# Altium PCB STEP_DRIVER_V3.0.PcbDoc (part 3 of 5)
Units mm, origin at the board's own origin, x right, y up, seen from the top; angles counter-clockwise.
Board outline 245.25 x 200.25 mm, 2 copper layers (Top Layer, Bottom Layer), stack 1.371 mm thick; 477 components, 170 nets, 1104 pads, 876 vias.
Unrouted connection lines stored in the file: 4.
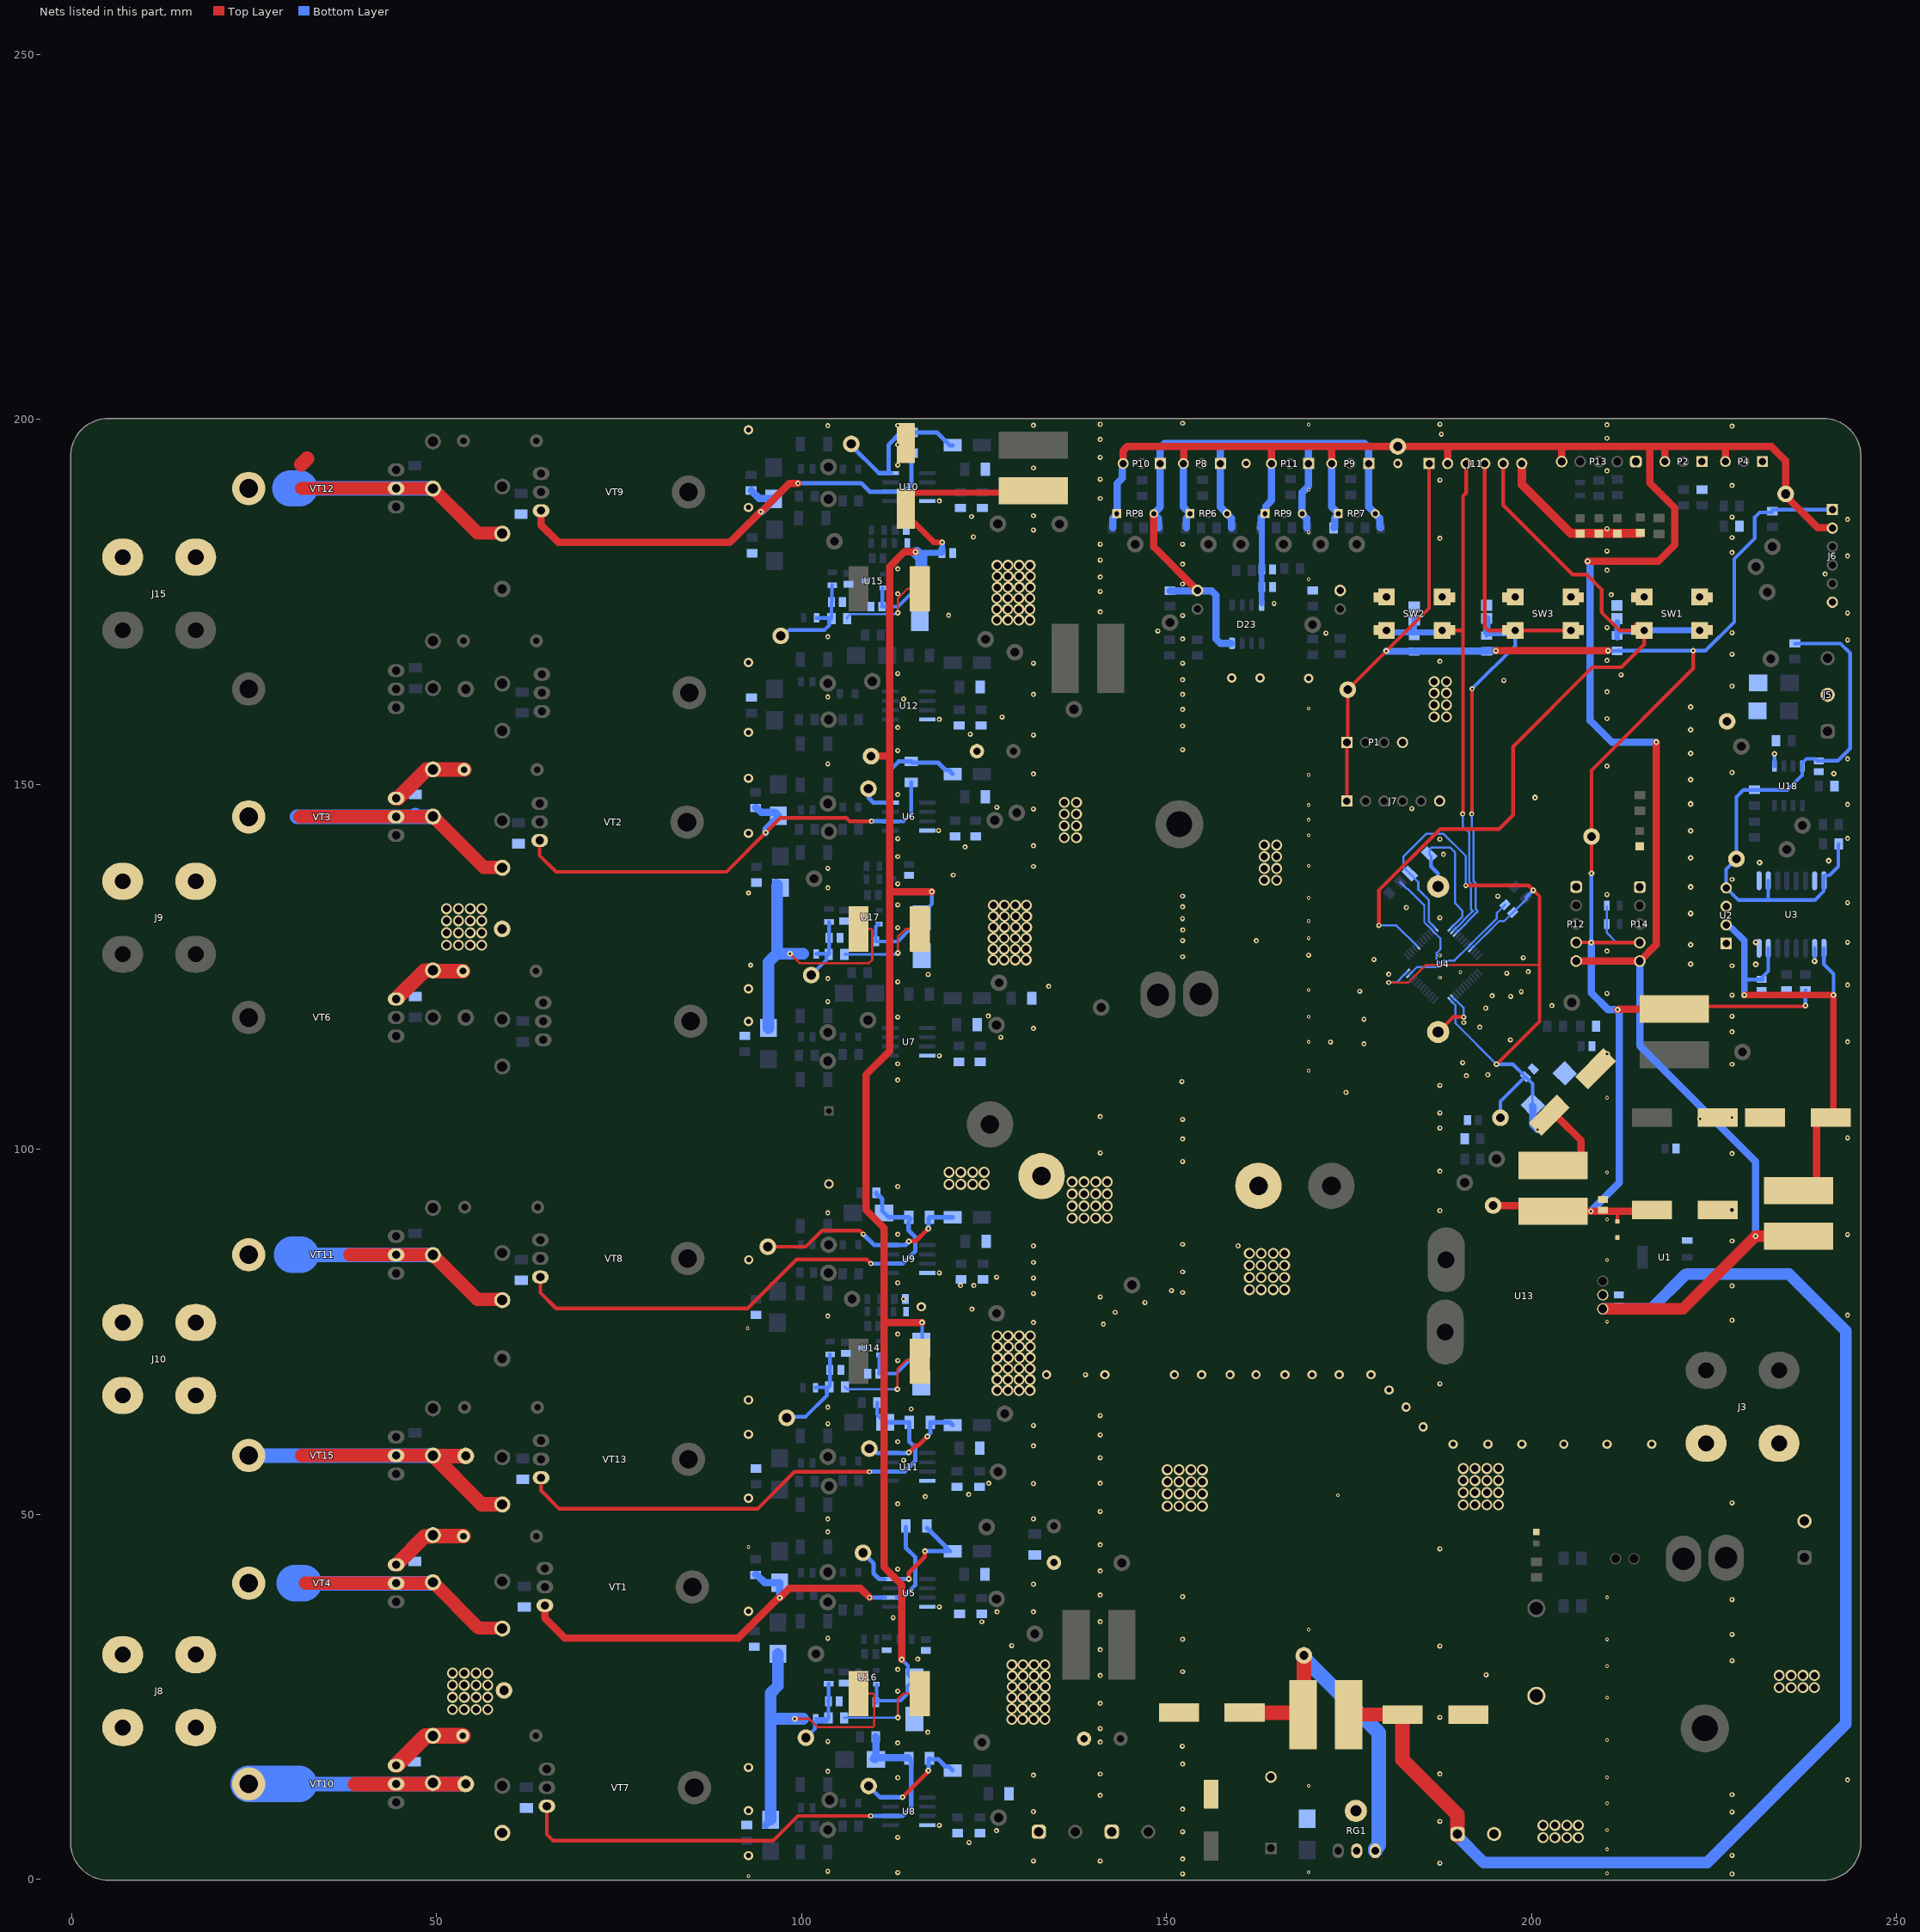
[diagram p2: the nets of this part, all layers, seen from the top]

## Via types
v1: diameter 0.7/0.7 (per signal layer), hole 0.3, Top Layer to Bottom Layer, tented both sides, 388 vias
v2: diameter 1.5/0.7 (per signal layer), hole 1, Top Layer to Bottom Layer, tented both sides, 206 vias
v3: diameter 0.8, hole 0.3, Top Layer to Bottom Layer, tented both sides, 99 vias
v4: diameter 1.5, hole 1, Top Layer to Bottom Layer, 96 vias
v5: diameter 0.5, hole 0.254, Top Layer to Bottom Layer, tented both sides, 42 vias
v6: diameter 1.27, hole 0.711, Top Layer to Bottom Layer, tented both sides, 22 vias
v7: diameter 1.27, hole 0.711, Top Layer to Bottom Layer, 17 vias
v8: diameter 1.27, hole 0.711, Top Layer to Bottom Layer, tented top, 2 vias
v9: diameter 1, hole 0.5, Top Layer to Bottom Layer, 2 vias
v10: diameter 0.7, hole 0.254, Top Layer to Bottom Layer, tented both sides, 2 vias

## Nets (pads, with @x,y where several pads share a name; then routed paths per layer and width w, separated by ;. In a path a pad name is that pad's centre, name@x,y a point inside that pad or via, vN(x,y) a via of type N, cw(c..) or ccw(c..) an arc to the next point about the centre after c; other vN are vias at no path point) (continued)
NetC21_1: (continued)
  Bottom Layer w0.5: TP46.1@101.325,123.875 103.387,125.937 103.387,126.381 R36.2@103.716,126.71 103.635,126.79 R33.1@101.992,126.79 ; R36.2@103.771,126.765 C21.1@103.771,128.979 R71.2@103.771,131.149
NetC22_1: C22.1 R74.2 R110.1 R112.2 TP70.1 | length 15
  Bottom Layer w0.5: TP70.1@97.15,170.35 97.528,170.35 98.336,171.158 103.168,171.158 103.766,171.756 103.766,172.397 R112.2@104.094,172.725 104.015,172.804 R110.1@102.044,172.804 ; R112.2@104.1,172.731 C22.1@104.1,174.985 104.159,175.044 104.159,177.213 R74.2@104.218,177.272
NetC23_1: C23.1 R73.2 R108.1 R111.2 TP69.1 | length 14.3
  Bottom Layer w0.5: TP69.1@98.151,63.376 100.577,63.376 103.472,66.27 103.472,67.122 R111.2@103.8,67.45 ; R108.1@101.919,67.35 101.969,67.4 R111.2@103.75,67.4 ; R111.2@103.8,67.626 103.897,67.723 103.897,69.557 R73.2@103.897,71.924 ; C23.1@103.8,69.557 103.843,69.6 103.843,69.75 C23.1@103.868,69.775
NetC24_1: C24.1 C56.1 C60.2 J8.2 R129.1 TP39.1 U8.6 VD5.1 VD7.2 VT7.S VT10.D ZD7.1 | length 122.5
  Top Layer w0.5: VT7.S@65.117,10.006 65.117,6.129 65.971,5.275 96.093,5.275 99.492,8.674 v1(109.468,8.674)
  Top Layer w2: 38.807,13.054 VT10.D@44.451,13.054 VD7.2@49.243,13.054 ; VD7.2@49.493,13.054 TP39.1@54,13.054
  Bottom Layer w0.6: v1(109.468,8.674) U8.6@112.204,8.674 113.856,8.674 115.023,9.841 115.023,16.227 C24.1@114.675,16.575
  Bottom Layer w1: ZD7.1@109.85,16.494 ZD7.1@109.912,16.432 ; ZD7.1@109.912,16.637 ZD7.1@110.175,16.637 ; R129.1@110.15,19.525 110.175,19.5 ZD7.1@110.175,16.637 ; ZD7.1@110.199,16.432 110.175,16.457 ZD7.1@110.175,16.637 ; C24.1@114.675,16.575 114.612,16.637 ZD7.1@110.175,16.637
  Bottom Layer w2: VT10.D@24.258,13.054 VT10.D@44.451,13.054 TP39.1@54,13.054
  Bottom Layer w5: VT10.D@24.258,13.054 31.144,13.054
NetC24_2: C24.2 D10.1 TP33.1 U8.8 | length 15.9
  Top Layer w0.6: v3(113.856,11.235) 117.322,14.701 117.322,14.859 v3(117.36,14.897)
  Bottom Layer w0.6: TP33.1@109.303,12.665 110.733,11.235 112.183,11.235 U8.8@112.204,11.214 112.225,11.235 v3(113.856,11.235) ; v3(117.36,14.897) 117.398,14.935 117.398,16.448 C24.2@117.525,16.575 117.658,16.442 118.724,16.442 119.718,15.447 120.168,15.447 D10.1@120.718,14.897
NetC29_1: C29.1 C73.1 C77.2 J10.1 R135.1 U9.6 VD9.1 VD11.2 VT8.S VT11.D ZD10.1 | length 112.9
  Top Layer w0.5: VT8.S@64.217,82.506 64.217,80.347 66.364,78.2 92.6,78.2 99.325,84.925 108.918,84.925 v1(109.493,84.35)
  Top Layer w1.8: 38.107,85.554 VT11.D@44.451,85.554 VD11.2@49.658,85.554 ; VD11.2@49.5,85.525 55.598,79.427 58.923,79.427 VD9.1@59,79.35
  Bottom Layer w0.5: v1(109.493,84.35) 109.498,84.345 112.2,84.345 U9.6@112.204,84.341
  Bottom Layer w0.6: R135.1@110.226,94.05 110.226,93.899 110.529,93.596 110.68,93.596 111.046,93.229 111.046,91.579 ZD10.1@111.325,91.3 111.934,90.691 C29.1@114.672,90.691 ; U9.6@112.204,84.341 113.859,84.341 115.597,86.079 115.597,87.367 ; C29.1@114.95,90.567 114.95,90.369 114.672,90.091 114.672,88.891 115.597,87.966 115.597,87.367
  Bottom Layer w2: 31.376,85.554 VT11.D@44.451,85.554 VD11.2@49.5,85.554
  Bottom Layer w5: 30.23,85.554 31.376,85.554
NetC29_2: C29.2 D11.1 TP47.1 U9.8 | length 29.5
  Top Layer w0.5: TP47.1@95.368,86.649 100.576,86.649 102.802,88.875 107.963,88.875 v1(108.461,88.377)
  Top Layer w0.6: v3(114.697,87.383) 114.735,87.422 115.651,87.422 v3@117.322,89.093
  Bottom Layer w0.6: v1(108.461,88.377) 109.957,86.881 114.239,86.881 114.697,87.339 v3(114.697,87.383) ; v3(117.36,89.131) 117.398,89.169 117.398,90.567 C29.2@117.522,90.691 D11.1@120.718,90.691
NetC31_1: C31.1 C74.1 C78.2 J15.1 R136.1 U10.6 VD10.1 VD12.2 VT9.S VT12.D ZD11.1 | length 118.5
  Top Layer w1: VT9.S@64.317,187.506 64.317,185.526 66.684,183.159 90.183,183.159 v3@94.431,187.407 ; v3@94.485,187.389 98.351,191.255 v1(99.512,191.255)
  Top Layer w1.8: 31.476,190.554 VT12.D@44.451,190.554 VD12.2@49.275,190.554 ; VD12.2@49.5,190.525 55.598,184.427 58.923,184.427 VD10.1@59,184.35
  Top Layer w2: 31.476,193.854 32.256,194.634
  Bottom Layer w0.6: v1(99.512,191.255) 108.181,191.255 109.335,190.101 U10.6@112.204,190.101 114.093,190.101 115.043,191.051 C31.1@115.043,195.35
  Bottom Layer w1: R136.1@93.089,190.277 94.188,189.178 ZD11.1@96.188,189.178 ; v3(94.431,187.334) 94.517,187.334 96.188,189.005 ZD11.1@96.188,189.105
  Bottom Layer w2: 31.194,190.554 VT12.D@44.451,190.554 VD12.2@49.25,190.554
  Bottom Layer w5: 29.947,190.554 31.194,190.554
NetC31_2: C31.2 D12.1 TP48.1 U10.8 | length 21.6
  Bottom Layer w0.6: TP48.1@106.818,196.648 106.818,196.418 110.595,192.641 111.92,192.641 U10.8@112.204,192.641 111.941,192.641 111.92,192.662 111.92,196.527 113.593,198.2 115.043,198.2 118.569,198.2 120.318,196.451 D12.1@120.718,196.451
NetC32_2: C32.2 C33.1 C71.2 C72.1 R32.2 R33.2 TP44.1 VD3.1 VD8.1 VT3.S VT6.S ZD5.1 ZD8.1 | length 63.8
  Top Layer w0.3: v3(98.433,126.79) 99.718,125.505 109.244,125.505 109.694,125.955 109.694,130.014 109.519,130.19 R32.2@107.8,130.19
  Top Layer w2: VT3.S@44.451,148.094 44.705,148.094 48.623,152.012 49.408,152.012 VD3.1@49.408,152.025 ; VT6.S@44.594,120.705 44.705,120.816 44.705,120.848 48.344,124.487 49.237,124.487 VD8.1@49.275,124.525 ; VD3.1@49.3,152.025 VD3.1@49.408,152.025 ; VD8.1@49.375,124.425 C71.2@53.625,124.425 ; C32.2@53.775,152.025 VD3.1@49.408,152.025
  Bottom Layer w1: ZD5.1@96.45,136.574 96.727,136.297 ZD5.1@96.625,136.195
  Bottom Layer w1.6: ZD8.1@95.45,116.625 95.45,125.615 96.625,126.79 ; ZD5.1@96.625,136.195 96.625,126.79 ; R33.2@100.24,126.79 v3(98.433,126.79) 96.625,126.79
  other v2: 51.368,127.982 52.993,127.982 54.618,127.982 56.193,127.982 51.368,129.657 52.993,129.657 54.618,129.657 56.193,129.657 51.368,131.307 52.993,131.307 54.618,131.307 56.193,131.307 51.368,132.957 52.993,132.957 54.618,132.957 56.193,132.957
NetC35_1: C35.1 C81.1 C84.2 J10.2 R140.1 TP63.1 U11.6 VD14.1 VD16.2 VT13.S VT15.D ZD15.1 | length 128.7
  Top Layer w0.5: VT13.S@64.317,55.006 64.317,53.251 66.818,50.75 93.962,50.75 99.037,55.825 v1(109.293,55.825)
  Top Layer w1.8: 31.476,58.054 VT15.D@44.451,58.054 VD16.2@49.299,58.054
  Top Layer w2: VD16.2@49.5,58.054 56.166,51.388 58.962,51.388 VD14.1@59,51.35 ; VD16.2@49.592,58.016 49.68,58.016 49.695,58 TP63.1@53.923,58
  Bottom Layer w0.5: R140.1@110.373,65.3 110.373,63.705 110.443,63.635 110.443,63.5 111.343,62.6 ZD15.1@111.443,62.6
  Bottom Layer w0.6: v1@109.293,55.865 U11.6@112.204,55.865 114.142,55.865 115.597,57.32 115.597,59.128 114.775,59.949 C35.1@114.775,62.6 ZD15.1@111.443,62.6
  Bottom Layer w2: VT15.D@24.258,58.054 VT15.D@44.451,58.054 VD16.2@49.5,58.054 VD16.2@49.557,58.054
NetC35_2: C35.2 D19.1 TP57.1 U11.8 | length 14.4
  Top Layer w0.6: v3(114.697,58.479) 115.648,59.431 116.008,59.431 v3@117.194,60.617
  Bottom Layer w0.6: TP57.1@109.293,59.002 109.749,59.002 110.346,58.405 114.568,58.405 114.643,58.479 v3(114.697,58.479) ; v3(117.232,60.655) 117.232,60.706 117.625,61.099 C35.2@117.625,62.6 120.333,62.6 D19.1@120.718,62.215